# Allegro board mib_rev3ox_v219.brd
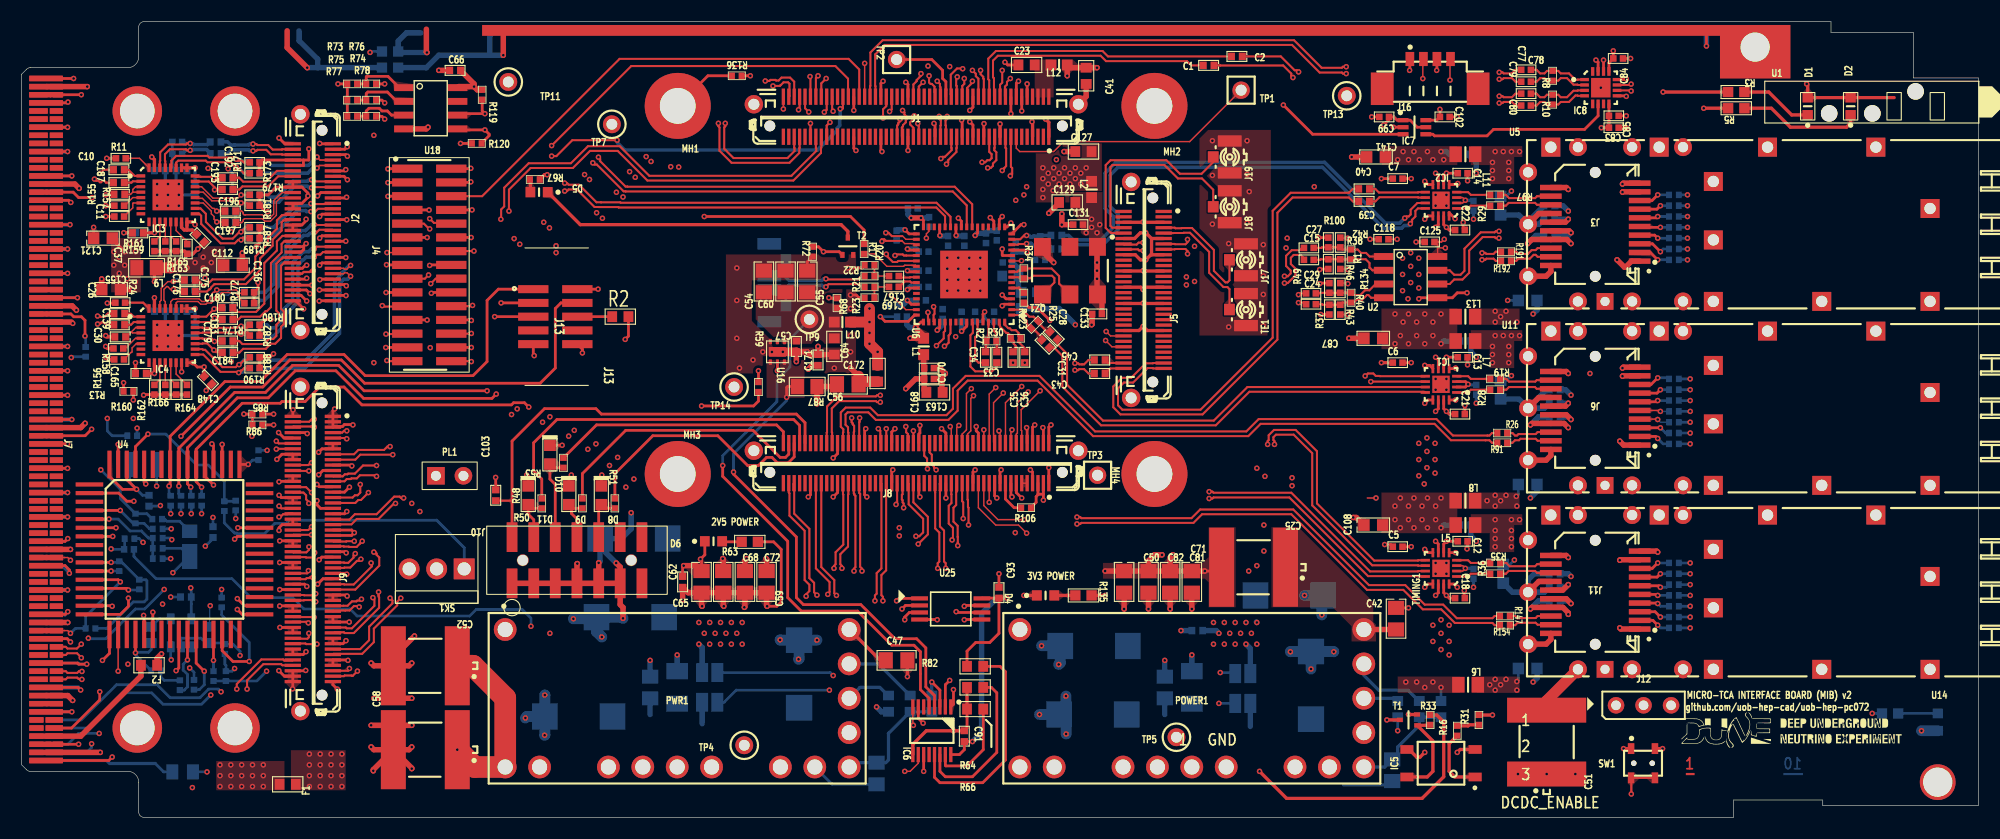
[diagram p0: board, top side]
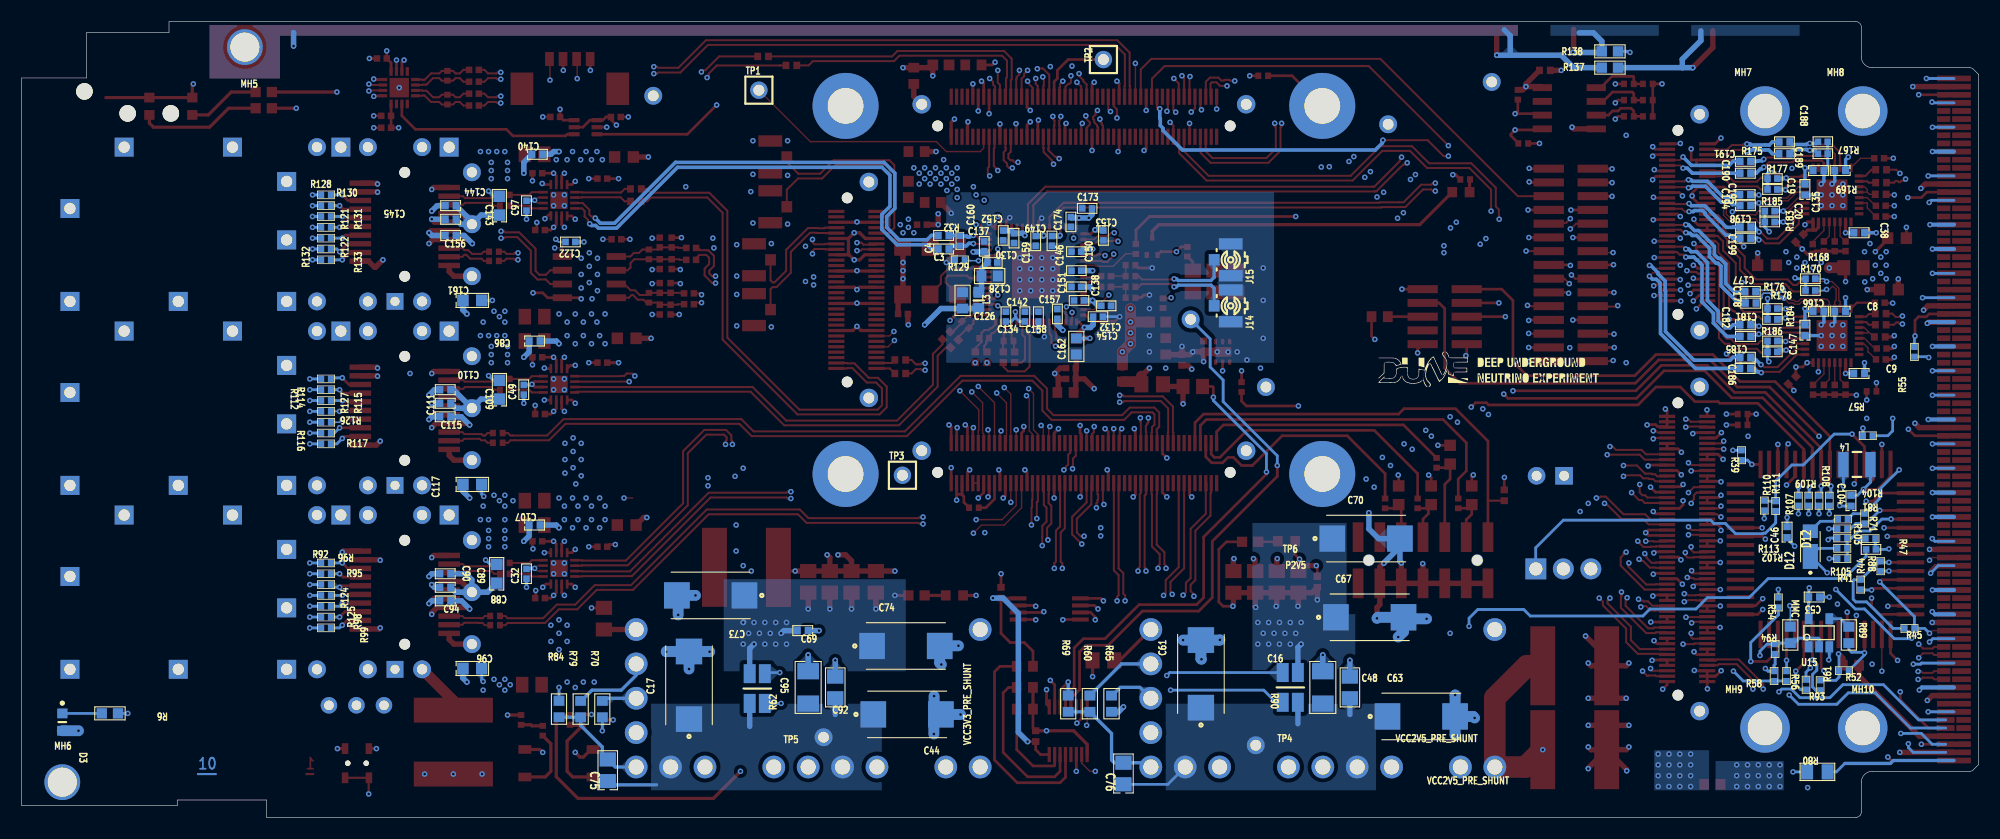
[diagram p1: board, bottom side, seen from below]

Outline 180.6 x 73.5 mm; copper layers: TOP, 02_GND, 03_SIG1, 04_GND, 05_PWR1, 06_GND, 07_SIG2, 08_GND, 09_SIG3, BOTTOM. Coordinates in mm from the lower left corner of the outline.
Outline path: 0,68.65 0.46,69.11 arc(0.62,69.21) 0.8,69.25 0.83,69.25 9.8,69.25 arc(10.51,69.54) 10.8,70.25 10.8,73.01 arc(10.95,73.36) 11.3,73.5 167,73.5 167,72.5 174.6,72.5 174.6,68.3 180.6,68.3 180.6,1.1 166.24,1.1 166.24,1.6 158,1.6 158,0 11.27,0 arc(11.06,0.06) 10.89,0.21 arc(10.82,0.34) 10.8,0.49 10.81,0.49 10.81,3.26 10.8,3.26 arc(10.5,3.96) 9.8,4.25 0.8,4.25 arc(0.62,4.29) 0.46,4.39 0,4.85 0,68.65

## Design rules (mm)
constraint set DEFAULT: min track width 0.127
net group AMC_N_PS: nets AMC_N_PS<0> AMC_N_PS<1>
net group AUXIO_2: nets AUXIO_N2 AUXIO_P2
net group AUXIO_3: nets AUXIO_N3 AUXIO_P3
net group AUXIO_4: nets AUXIO_N4 AUXIO_P4
net group AUXIO_5: nets AUXIO_N5 AUXIO_P5
net group AUXIO_6: nets AUXIO_N6 AUXIO_P6
net group AUXIO_7: nets AUXIO_N7 AUXIO_P7
net group CLK_TST: nets CLK_TST_N CLK_TST_P
net group CLKIN0: nets CLKIN0_N CLKIN0_P
net group CLKIN1: nets CLKIN1_N CLKIN1_P
net group CLKIN2: nets CLKIN2_N CLKIN2_P
net group CLKIN3: nets CLKIN3_N CLKIN3_P
net group DCT_DAT2: nets DCT_DAT2_N DCT_DAT2_P
net group DIRECT_US_DATA_2: nets DIRECT_US_DATA_2_N DIRECT_US_DATA_2_P
net group DP1: nets RCLK_N0 RCLK_N1
net group DP2: nets RCLK_P0 RCLK_P1
net group DP_AUX_GBE_RX: nets AUX_GBE_RX_N AUX_GBE_RX_P
net group DP_AUX_GBE_TX: nets AUX_GBE_TX_N AUX_GBE_TX_P
net group DP_CLK0: nets CLK_N<0> CLK_P<0>
net group DP_CLK1: nets CLK_N<1> CLK_P<1>
net group DP_DATA_IN0: nets DATA_IN_N<0> DATA_IN_P<0>
net group DP_DATA_IN1: nets DATA_IN_N<1> DATA_IN_P<1>
net group DP_DATA_IN2: nets DATA_IN_N<2> DATA_IN_P<2>
net group DP_DATA_IN3: nets DATA_IN_N<3> DATA_IN_P<3>
net group DP_DATA_IN4: nets DATA_IN_N<4> DATA_IN_P<4>
net group DP_DATA_IN5: nets DATA_IN_N<5> DATA_IN_P<5>
net group DP_DATA_IN6: nets DATA_IN_N<6> DATA_IN_P<6>
net group DP_DATA_IN7: nets DATA_IN_N<7> DATA_IN_P<7>
net group DP_DATA_IN8: nets DATA_IN_N<8> DATA_IN_P<8>
net group DP_DATA_IN9: nets DATA_IN_N<9> DATA_IN_P<9>
net group DP_DATA_IN10: nets DATA_IN_N<10> DATA_IN_P<10>
net group DP_DATA_IN11: nets DATA_IN_N<11> DATA_IN_P<11>
net group DP_DATA_OUT0: nets DATA_OUT_N<0> DATA_OUT_P<0>
net group DP_DATA_OUT1: nets DATA_OUT_N<1> DATA_OUT_P<1>
net group DP_DATA_OUT2: nets DATA_OUT_N<2> DATA_OUT_P<2>
net group DP_DATA_OUT3: nets DATA_OUT_N<3> DATA_OUT_P<3>
net group DP_DATA_OUT4: nets DATA_OUT_N<4> DATA_OUT_P<4>
net group DP_DATA_OUT5: nets DATA_OUT_N<5> DATA_OUT_P<5>
net group DP_DATA_OUT6: nets DATA_OUT_N<6> DATA_OUT_P<6>
net group DP_DATA_OUT7: nets DATA_OUT_N<7> DATA_OUT_P<7>
net group DP_DATA_OUT8: nets DATA_OUT_N<8> DATA_OUT_P<8>
net group DP_DATA_OUT9: nets DATA_OUT_N<9> DATA_OUT_P<9>
net group DP_DATA_OUT10: nets DATA_OUT_N<10> DATA_OUT_P<10>
net group DP_DATA_OUT11: nets DATA_OUT_N<11> DATA_OUT_P<11>
net group DP_DC_REF_CLK0: nets DC_REF_CLK_N<0> DC_REF_CLK_P<0>
net group DP_DC_REF_CLK1: nets DC_REF_CLK_N<1> DC_REF_CLK_P<1>
net group DP_DC_REF_CLK2: nets DC_REF_CLK_N<2> DC_REF_CLK_P<2>
net group DP_DC_REF_CLK3: nets DC_REF_CLK_N<3> DC_REF_CLK_P<3>
net group DP_DC_REF_CLK4: nets DC_REF_CLK_N<4> DC_REF_CLK_P<4>
net group DP_DC_REF_CLK5: nets DC_REF_CLK_N<5> DC_REF_CLK_P<5>
net group DP_DC_REF_CLK6: nets DC_REF_CLK_N<6> DC_REF_CLK_P<6>
net group DP_DC_REF_CLK7: nets DC_REF_CLK_N<7> DC_REF_CLK_P<7>
net group DP_DC_REF_CLK8: nets DC_REF_CLK_N<8> DC_REF_CLK_P<8>
net group DP_DC_REF_CLK9: nets DC_REF_CLK_N<9> DC_REF_CLK_P<9>
net group DP_DC_REF_CLK10: nets DC_REF_CLK_N<10> DC_REF_CLK_P<10>
net group DP_DC_REF_CLK11: nets DC_REF_CLK_N<11> DC_REF_CLK_P<11>
net group DP_DFF_REF_CLK0: nets DFF_REF_CLK_N<0> DFF_REF_CLK_P<0>
net group DP_DFF_REF_CLK1: nets DFF_REF_CLK_N<1> DFF_REF_CLK_P<1>
net group DP_DFF_REF_CLK2: nets DFF_REF_CLK_N<2> DFF_REF_CLK_P<2>
net group DP_GBE_RX: nets GBE_RX_N GBE_RX_P
net group DP_GBE_TX: nets GBE_TX_N GBE_TX_P
net group DP_REF_CLK0: nets REF_CLK_N<0> REF_CLK_P<0>
net group DP_REF_CLK1: nets REF_CLK_N<1> REF_CLK_P<1>
net group DP_REF_CLK2: nets REF_CLK_N<2> REF_CLK_P<2>
net group DP_REF_CLK3: nets REF_CLK_N<3> REF_CLK_P<3>
net group DP_REF_CLK4: nets REF_CLK_N<4> REF_CLK_P<4>
net group DP_REF_CLK5: nets REF_CLK_N<5> REF_CLK_P<5>
net group DP_REF_CLK6: nets REF_CLK_N<6> REF_CLK_P<6>
net group DP_REF_CLK7: nets REF_CLK_N<7> REF_CLK_P<7>
net group DP_REF_CLK8: nets REF_CLK_N<8> REF_CLK_P<8>
net group DP_REF_CLK9: nets REF_CLK_N<9> REF_CLK_P<9>
net group DP_REF_CLK10: nets REF_CLK_N<10> REF_CLK_P<10>
net group DP_REF_CLK11: nets REF_CLK_N<11> REF_CLK_P<11>
net group DP_SFP_RD0: nets SFP_RD_N<0> SFP_RD_P<0>
net group DP_SFP_RD1: nets SFP_RD_N<1> SFP_RD_P<1>
net group DP_SFP_RD2: nets SFP_RD_N<2> SFP_RD_P<2>
net group DP_SFP_TD0: nets SFP_TD_N<0> SFP_TD_P<0>
net group DP_SFP_TD1: nets SFP_TD_N<1> SFP_TD_P<1>
net group DP_SFP_TD2: nets SFP_TD_N<2> SFP_TD_P<2>
net group DP_UPSTREAM_DATA0: nets UPSTREAM_DATA_N_<0> UPSTREAM_DATA_P<0>
net group DP_UPSTREAM_DATA1: nets UPSTREAM_DATA_N_<1> UPSTREAM_DATA_P<1>
net group DP_UPSTREAM_DATA2: nets UPSTREAM_DATA_N_<2> UPSTREAM_DATA_P<2>
net group DP_XTAL: nets XA XB
net group DPDATA_FROM_UPSTREAM0: nets DATA_FROM_UPSTREAM_N<0> DATA_FROM_UPSTREAM_P<0>
net group DPDATA_FROM_UPSTREAM1: nets DATA_FROM_UPSTREAM_N<1> DATA_FROM_UPSTREAM_P<1>
net group DPDATA_FROM_UPSTREAM2: nets DATA_FROM_UPSTREAM_N<2> DATA_FROM_UPSTREAM_P<2>
net group DPDFF_CLK2: nets DFF_CLK_N<2> DFF_CLK_P<2>
net group DPSFP_DATA_OUT0: nets SFP_DATA_OUT_N<0> SFP_DATA_OUT_P<0>
net group DPSFP_DATA_OUT1: nets SFP_DATA_OUT_N<1> SFP_DATA_OUT_P<1>
net group DPSFP_DATA_OUT2: nets SFP_DATA_OUT_N<2> SFP_DATA_OUT_P<2>
net group DPUDATA_IN2: nets UDATA_IN_N<2> UDATA_IN_P<2>
net group FBCLK: nets FBCLK_N FBCLK_P
net group MAX9831: nets MAX9831_N MAX9831_P
net group MXCK: nets MXCK_N MXCK_P
net group REFCLK_OUT0: nets REFCLK_OUT0_N REFCLK_OUT0_P
net group REFCLK_OUT1: nets REFCLK_OUT1_N REFCLK_OUT1_P
net group SCOPE: nets SCOPE_N SCOPE_P
net group SFP0_CLKGEN: nets SFP0_CLKGEN_N SFP0_CLKGEN_P
net group SFP1_CLKGEN: nets SFP1_CLKGEN_N SFP1_CLKGEN_P
net group SFP2_CLKGEN: nets SFP2_CLKGEN_N SFP2_CLKGEN_P
net group SFPTD2: nets SFPTD2_N SFPTD2_P
net group AMC_GA: nets AMC_GA<0> AMC_GA<1> AMC_GA<2>
net group BP_1: nets AMC_N_ENABLE IMPB_SCL IMPB_SDA PWR_ON TCK_2 TDI_2 TDO_2 TMS_2
net group CLKGEN_IO_1: nets CLK_INTR CLK_LOL CLK_RST CLK_SCL CLK_SDA CLK_SEL0 CLK_SEL1
net group POWER: nets DCDC_2V5_PG DCDC_3V3_PG DCDC_ENABLE LDO_1V8_PG SENSE_I2C_SCL SENSE_I2C_SDA
net group SFP_LOS: nets SFP_LOS<0> SFP_LOS<1> SFP_LOS<2>
net group SFP_RATE_SELECT: nets SFP_RATE_SELECT<0> SFP_RATE_SELECT<1> SFP_RATE_SELECT<2>
net group SFP_SCL: nets SFP_SCL<0> SFP_SCL<1> SFP_SCL<2>
net group SFP_SDA: nets SFP_SDA<0> SFP_SDA<1> SFP_SDA<2>
net group SFP_TX_DISABLE: nets SFP_TX_DISABLE<0> SFP_TX_DISABLE<1> SFP_TX_DISABLE<2>
net group SFP_TX_FAULT: nets SFP_TX_FAULT<0> SFP_TX_FAULT<1> SFP_TX_FAULT<2>
net group VIN: nets VP12

## Placement (name value [footprint] x y rotation side)
C1  0.1UF  [CAP0402]  109.56 69.46 0 top
C2  0.1UF  [CAP0402]  112.17 70.29 0 top
C3  0.1UF  [CAP0402]  95.51 52.5 180 bottom
C4  0.1UF  [CAP0402]  95.51 53.75 180 bottom
C5  1uF  [C0402]  127.01 25 0 top
C6  1uF  [C0402]  127.01 42 0 top
C7  1uF  [C0402]  127.01 59 0 top
C8  100nF  [CAP0402]  12.76 46.75 180 bottom
C9  1UF  [CAP0402]  11.01 41 180 bottom
C10  0.1UF  [CAP0402]  8.98 59.82 0 top
C11  0.1UF  [CAP0402]  8.98 58.63 0 top
C12  100nF  [C0402]  133.01 25.5 0 top
C13  100nF  [C0402]  133.01 42.5 0 top
C14  100nF  [C0402]  133.01 59.5 0 top
C15  100nF  [C0402]  118.81 51.5 0 top
C16  100UF  [CAP1206]  60.51 12 90 bottom
C17  220uF  [T520V]  119.01 12.2 90 bottom
C18  1nF  [C0402]  132.76 20.25 0 top
C19  100nF  [CAP0402]  14.76 59.75 0 bottom
C20  1UF  [CAP0402]  16.01 58 270 bottom
C21  1nF  [C0402]  132.76 37.25 0 top
C22  1nF  [C0402]  132.76 54.25 0 top
C23  1uF  [C0603]  92.76 69.5 0 top
C24  100nF  [C0402]  119.01 47.4 0 top
C25  220uF  [CTE_VISHAY_597D-M]  113.71 23.1 180 top
C26  0.1UF  [CAP0402]  9.02 46.53 0 top
C27  100nF  [C0402]  118.81 52.6 0 top
C28  0.1UF  [CAP0402]  95.26 44.5 135 top
C29  100nF  [C0402]  119.01 48.4 0 top
C30  0.1UF  [CAP0402]  9.01 45.5 0 top
C31  0.1UF  [CAP0402]  94.51 43.75 135 top
C32  100nF  [C0402]  134.01 22.5 90 bottom
C33  0.1UF  [CAP0402]  90.01 42.5 90 top
C34  0.1UF  [CAP0402]  88.96 42.5 90 top
C35  0.1UF  [CAP0402]  91.51 42.5 90 top
C36  0.1UF  [CAP0402]  92.59 42.5 90 top
C37  100nF  [CAP0402]  10.73 53.99 0 top
C38  1UF  [CAP0402]  11.01 54 180 bottom
C39  0.1UF  [CAP0402]  123.91 56.9 0 top
C40  0.1UF  [CAP0402]  123.91 58.05 0 top
C41  1uF  [C0603]  98.26 68.5 90 top
C42  0.1UF  [CAP0805]  126.86 18.35 90 top
C43  0.1UF  [CAP0402]  99.51 41 180 top
C44  220uF  [T520V]  98.88 9.51 180 bottom
C45  0.1UF  [CAP0402]  99.51 42.25 180 top
C46  0.47UF  [CAP0402]  17.66 26.35 270 bottom
C47  0.1UF  [CAP0805]  80.76 14.5 0 top
C48  0.1UF  [CAP0805]  58.01 12 90 bottom
C49  100nF  [C0402]  134.26 39.5 90 bottom
C50  47UF  [CAP0805]  101.76 21.75 90 top
C51  220uF  [CTE_VISHAY_597D-M]  140.76 6.95 90 top
C52  220uF  [CTE_VISHAY_597D-M]  37.26 14 180 top
C53  0.1UF  [CAP0402]  15.16 20.35 180 bottom
C54  47UF  [CAP0805]  68.51 49.5 90 top
C55  47UF  [CAP0805]  72.51 49.5 90 top
C56  47UF  [CAP0805]  76.26 40 0 top
C57  0.1UF  [CAP0402]  71.51 43.5 270 top
C58  220uF  [CTE_VISHAY_597D-M]  37.26 6.25 180 top
C59  47UF  [CAP0805]  68.76 21.75 90 top
C60  47UF  [CAP0805]  70.51 49.5 90 top
C61  220uF  [T520V]  71.76 13.25 90 bottom
C62  0.1UF  [CAP0402]  61.01 21.75 90 top
C63  220uF  [T520V]  51.42 9.32 180 bottom
C64  0.1UF  [CAP0402]  73.51 42.25 90 top
C65  47UF  [CAP0805]  62.76 21.75 90 top
C66  0.1UF  [CAP0402]  40.01 69 180 top
C67  220uF  [T520V]  56.18 18.48 180 bottom
C68  47UF  [CAP0805]  64.76 21.75 90 top
C69  0.1UF  [CAP0402]  108.51 17.25 180 bottom
C70  220uF  [T520V]  56.51 25.75 180 bottom
C71  47UF  [CAP0805]  108.01 21.75 90 top
C72  47UF  [CAP0805]  66.76 21.75 90 top
C73  220uF  [T520V]  117.01 20.5 0 bottom
C74  220uF  [T520V]  98.99 15.83 180 bottom
C75  0.1UF  [CAP0805]  126.51 4.35 270 bottom
C76  0.1UF  [CAP0805]  78.91 4.05 270 bottom
C77  100nF  [C0402]  138.86 69.05 0 top
C78  100nF  [C0402]  138.86 67.95 0 top
C79  100nF  [C0402]  138.86 66.85 0 top
C80  100nF  [C0402]  138.86 65.75 0 top
C81  47UF  [CAP0805]  106.01 21.75 90 top
C82  47UF  [CAP0805]  104.01 21.75 90 top
C83  1uF  [C0402]  146.96 63.7 180 top
C84  100nF  [C0402]  147.36 70.1 180 top
C85  1nF  [C0402]  146.96 64.8 180 top
C86  0.1UF  [CAP0402]  133.26 44 0 bottom
C87  10UF  [CAP0603]  124.76 44.25 180 top
C88  22UF  [CAP0603]  136.76 22.5 270 bottom
C89  1UF  [CAP0402]  141.51 22.5 180 bottom
C90  0.1UF  [CAP0402]  141.51 21.25 180 bottom
C91  0.1UF  [CAP0402]  87.01 7.5 270 top
C92  0.1UF  [CAP0805]  105.51 12 90 bottom
C93  0.1UF  [CAP0402]  90.21 20.75 90 top
C94  0.1UF  [CAP0402]  141.51 20 180 bottom
C95  100UF  [CAP1206]  108.01 12 90 bottom
C96  22UF  [CAP0603]  139.01 13.75 0 bottom
C97  100nF  [C0402]  134.01 56.5 90 bottom
C99  100nF  [C0402]  125.76 64.7 180 top
C102  100nF  [C0402]  131.36 64.7 0 top
C103  0.1UF  [CAP0402]  43.76 29.75 90 top
C104  0.1UF  [CAP0402]  11.76 29.25 270 bottom
C107  0.1UF  [CAP0402]  133.26 27 0 bottom
C108  10UF  [CAP0603]  124.76 27 180 top
C109  22UF  [CAP0603]  136.51 39.5 270 bottom
C110  1UF  [CAP0402]  141.51 39.5 180 bottom
C111  0.1UF  [CAP0402]  141.51 38.25 180 bottom
C112  10UF  [CAP0603]  19.51 51 0 top
C115  0.1UF  [CAP0402]  141.51 37 180 bottom
C117  22UF  [CAP0603]  139.01 30.75 0 bottom
C118  1uF  [C0402]  125.71 53.4 0 top
C121  10UF  [CAP0603]  7.51 53.5 180 top
C122  100nF  [C0402]  129.96 53.15 0 bottom
C125  1nF  [C0402]  129.96 53.15 0 top
C126  10uF  [C0603]  93.76 47.75 270 bottom
C127  10uF  [C0603]  98.01 61.5 0 top
C128  10uF  [C0603]  91.26 50 0 bottom
C129  10uF  [C0603]  96.51 56.8 0 top
C130  1uF  [C0402]  91.01 51.25 0 bottom
C131  1uF  [C0402]  97.51 54.75 0 top
C132  1uF  [C0402]  80.51 47.25 0 bottom
C133  100nF  [C0402]  99.26 46.5 0 top
C134  1uF  [C0402]  89.76 46.25 270 bottom
C135  100nF  [CAP0402]  12.76 59.75 180 bottom
C136  100nF  [CAP0402]  16.51 53.5 135 top
C137  100nF  [C0402]  91.76 52.75 270 bottom
C138  100nF  [C0402]  83.01 47.75 180 bottom
C139  100nF  [CAP0402]  9.1 44.38 0 top
C140  0.1UF  [CAP0402]  133.01 61.25 0 bottom
C141  10UF  [CAP0603]  125.01 61 180 top
C142  100nF  [C0402]  88.01 46.25 270 bottom
C143  22UF  [CAP0603]  136.51 56.5 270 bottom
C144  1UF  [CAP0402]  141.01 56.5 180 bottom
C145  0.1UF  [CAP0402]  141.01 55.25 180 bottom
C146  100nF  [C0402]  83.26 52.25 180 bottom
C147  1UF  [CAP0402]  16.01 45 270 bottom
C148  100nF  [CAP0402]  17.2 40.38 135 top
C149  100nF  [C0402]  85.51 53.25 90 bottom
C150  100nF  [C0402]  83.26 50.5 180 bottom
C151  100nF  [C0402]  83.26 49 180 bottom
C152  100nF  [C0402]  89.01 53.5 90 bottom
C153  100nF  [C0402]  80.76 53.75 90 bottom
C154  100nF  [C0402]  81.26 46.25 0 bottom
C155  10UF  [CAP0603]  8.26 48.75 180 top
C156  0.1UF  [CAP0402]  141.01 53.75 180 bottom
C157  100nF  [C0402]  85.01 46.5 270 bottom
C158  100nF  [C0402]  86.76 46.25 270 bottom
C159  100nF  [C0402]  87.01 53.25 90 bottom
C160  1uF  [C0402]  90.01 53.75 90 bottom
C161  22UF  [CAP0603]  139.01 47.75 0 bottom
C162  10uF  [C0603]  83.26 43.5 90 bottom
C163  10uF  [C0603]  84.26 39.25 180 top
C165  100nF  [CAP0402]  11.01 41 0 top
C166  100nF  [CAP0402]  14.76 46.75 0 bottom
C167  100nF  [C0402]  80.51 50 180 top
C168  1uF  [C0402]  83.76 40.5 180 top
C169  100nF  [C0402]  80.51 49 180 top
C170  100nF  [C0402]  83.76 41.5 180 top
C171  10uF  [C0603]  75.01 43.5 90 top
C172  10uF  [C0603]  79.01 41 90 top
C173  1uF  [C0402]  82.26 56.25 180 bottom
C174  100nF  [C0402]  83.76 55 90 bottom
C175  100nF  [CAP0402]  15.52 49.63 0 top
C176  100nF  [CAP0402]  15.53 48.57 0 top
C177  100nF  [CAP0402]  21.06 48.58 0 bottom
C178  100nF  [CAP0402]  21.01 47.5 0 bottom
C179  100nF  [CAP0402]  18.99 47.08 0 top
C180  100nF  [CAP0402]  19.01 46 0 top
C181  100nF  [CAP0402]  21.51 45.5 0 bottom
C182  100nF  [CAP0402]  21.5 44.42 0 bottom
C183  100nF  [CAP0402]  19.01 44 0 top
C184  100nF  [CAP0402]  19.02 42.93 0 top
C185  100nF  [CAP0402]  21.51 42.5 0 bottom
C186  100nF  [CAP0402]  21.53 41.47 0 bottom
C187  100nF  [CAP0402]  9.02 57.55 0 top
C188  100nF  [CAP0402]  17.9 62.39 0 bottom
C189  100nF  [CAP0402]  17.91 61.3 0 bottom
C190  100nF  [CAP0402]  21.51 60.6 0 bottom
C191  100nF  [CAP0402]  21.51 59.5 0 bottom
C192  100nF  [CAP0402]  19.01 59.08 0 top
C193  100nF  [CAP0402]  19.01 58 0 top
C194  100nF  [CAP0402]  21.53 57.52 0 bottom
C195  100nF  [CAP0402]  21.51 56.5 0 bottom
C196  100nF  [CAP0402]  19.26 56 0 top
C197  100nF  [CAP0402]  19.28 54.94 0 top
C198  100nF  [CAP0402]  21.49 54.53 0 bottom
C199  100nF  [CAP0402]  21.51 53.5 0 bottom
D1  GREEN  [LEDC1608X80N]  164.85 65.68 90 top
D2  RED  [LEDC1608X80N]  168.81 65.68 90 top
D3  LTST-C170TBKT  [LEDC1608X80N]  176.85 8.8 270 bottom
D4  RED  [LEDC1608X80N]  94.51 20.5 0 top
D5  GREEN  [LEDC1608X80N]  47.76 57.75 180 top
D6  GREEN  [LEDC1608X80N]  63.86 25.5 0 top
D8  PGB1010603NR  [D0603]  53.51 29.75 270 top
D9  PGB1010603NR  [D0603]  50.51 29.75 270 top
D10  PGB1010603NR  [D0603]  48.76 33.5 270 top
D11  PGB1010603NR  [D0603]  46.76 29.75 270 top
D12  -  [SS16FP]  15.51 25 90 bottom
F1  -  [C0603]  24.56 3.05 180 top
F2  -  [C0603]  11.76 14.05 180 top
IC1  -  [QFN50P300X300X90-17N-S160]  131.01 40 180 top
IC2  -  [QFN50P300X300X90-17N-S160]  131.01 57 180 top
IC3  -  [QFN50P500X500X100-33N-S285]  13.51 57.5 0 top
IC4  -  [QFN50P500X500X100-33N-S285]  13.51 44.5 0 top
IC5  -  [TOSHIBA_11-4M1S]  131.01 5 180 top
IC6  -  [SOP50P490X110-16N]  84.01 8 270 top
IC7  -  [SOP65P210X110-6N]  128.56 63.75 0 top
IC8  -  [QFN50P300X300X100-17N-S180]  145.76 67.4 0 top
J1  LSHM-150-03.0-L-DV-A-S-K-TR  [SAMTEC_LSHM-150-04-0-L-DV-A-S]  82.56 64.77 0 top
J2  LSHM-130-03.0-L-DV-A-S-K-TR  [SAMTEC_LSHM-130-04-0-L-DV-A-S]  26.83 54.97 90 top
J3  1367073-1  [TYCO_1367073]  145.24 54.77 180 top
J4  -  [FTSH-115-01-L-DV]  37.62 51.66 270 top
J5  LSHM-130-03.0-L-DV-A-S-K-TR  [SAMTEC_LSHM-130-04-0-L-DV-A-S]  103.51 48.72 90 top
J6  1367073-1  [TYCO_1367073]  145.24 37.78 180 top
J7  MCH_TG1-EDGE-170  [AMC0_R2_BPLUS_PCB_EDGE]  2.25 36.75 0 top
J8  LSHM-150-03.0-L-DV-A-S-K-TR  [SAMTEC_LSHM-150-04-0-L-DV-A-S]  82.56 32.77 0 top
J9  LSHM-150-03.0-L-DV-A-S-K-TR  [SAMTEC_LSHM-150-04-0-L-DV-A-S]  26.83 24.79 90 top
J10  7X2RECPT_SMD_2MM  [HDR14PINSMD]  51.26 23.75 180 top
J11  1367073-1  [TYCO_1367073]  145.24 20.79 180 top
J12  HDR1X3  [HDR_1X3]  147.16 10.35 0 top
J13  -  [SHF-105-01-X-D-SM]  49.26 46.25 270 top
J14  -  [HIROSE_U-FL-R-SMT-1_10]  69.01 47.25 90 bottom
J15  -  [HIROSE_U-FL-R-SMT-1_10]  69.01 51.5 90 bottom
J16  -  [MOLEX_53398-0471]  128.76 68.25 0 top
J17  -  [HIROSE_U-FL-R-SMT-1_10]  113.01 51.5 90 top
J18  -  [HIROSE_U-FL-R-SMT-1_10]  111.51 56.4 90 top
J19  -  [HIROSE_U-FL-R-SMT-1_10]  111.51 61 90 top
L1  120  OHM@100MHZ  [INDC1608X95N]  83.26 43.5 270 top
L2  120  OHM@100MHZ  [INDC1608X95N]  98.76 58 270 top
L3  120  OHM@100MHZ  [INDC1608X95N]  92.26 47.75 90 bottom
L4  10 UH  [INDC2520X220N]  11.21 32.6 0 bottom
L5  1 UH  [INDC2013X105N]  133.26 27 0 top
L6  1 UH  [INDC2013X105N]  133.51 12.25 180 top
L7  1 UH  [INDC2013X105N]  133.26 44 0 top
L8  1 UH  [INDC2013X105N]  133.26 29.25 180 top
L9  -  [C0805]  11.53 50.77 180 top
L10  120  OHM@100MHZ  [INDC1608X95N]  75.76 45.75 0 top
L11  1 UH  [INDC2013X105N]  133.26 61.25 0 top
L12  100R@100MHz  [INDC1608X95N]  95.76 69.5 0 top
L13  1 UH  [INDC2013X105N]  133.26 46.25 180 top
MH1  MT_HOLE  [MOUNTHOLE]  60.56 65.72 0 top
MH2  MT_HOLE  [MOUNTHOLE]  104.56 65.72 0 top
MH3  MT_HOLE  [MOUNTHOLE]  60.56 31.72 0 top
MH4  MT_HOLE  [MOUNTHOLE]  104.56 31.72 0 top
MH5  MT_HOLE  [MOUNTHOLE]  160 71.15 180 bottom
MH6  MT_HOLE  [MOUNTHOLE]  176.85 3.25 180 bottom
MH7  MT_HOLE  [MOUNTHOLE]  19.69 65.25 180 bottom
MH8  MT_HOLE  [MOUNTHOLE]  10.67 65.25 180 bottom
MH9  MT_HOLE  [MOUNTHOLE]  19.69 8.26 180 bottom
MH10  MT_HOLE  [MOUNTHOLE]  10.67 8.26 180 bottom
MMC  00  [C0603]  17.36 16.85 270 bottom
NOREF  -  []  153.21 6.4 0 top
NOREF#2  -  []  153.92 4.25 0 top
NOREF#3  -  []  158 0.73 0 top
NOREF#4  -  []  0 64.12 0 top
NOREF#5  -  []  -27.5 136.85 0 top
NOREF#6  -  []  167 73.04 0 top
NOREF#7  -  []  0.01 0 0 top
NOREF#8  -  []  0 63.55 0 top
NOREF#9  -  []  0 39.45 0 top
NOREF#10  -  []  0.92 4.25 90 top
NOREF#11  -  []  161.05 4 90 top
NOREF#12  -  []  178.32 68.3 90 top
NOREF#13  -  []  -38.3 124.03 0 top
NOREF#14  -  []  142.94 4.81 0 top
NOREF#15  -  []  10.8 72.31 0 top
NOREF#16  -  []  157.38 0 90 top
NOREF#17  -  []  -26.64 123.32 0 top
NOREF#18  -  []  -255.82 -99.62 0 top
NOREF#19  -  []  15.11 0 90 top
NOREF#20  -  []  5.36 4.25 90 top
NOREF#21  -  []  68.05 25.73 180 bottom
PL1  -  [HEADER2X1_STR]  39.51 31.55 0 top
POWER1  -  [PWS_TI_ECP-R-PDSS-T14]  108.01 11 0 top
PWR1  -  [PWS_TI_ECP-R-PDSS-T14]  60.51 11 0 top
QZ1  50MHz  [OSCSC254P500X700X100-6N]  96.76 50.5 270 top
R1  100  [RES0402]  122.71 52 90 top
R2  00  [C0603]  55.26 46.25 0 top
R3  249 OHM  [RES0603]  158.26 67 180 top
R5  249 OHM  [RES0603]  158.26 65.5 180 top
R6  160 OHM  [RES0603]  172.46 9.6 180 bottom
R8  100  [RES0402]  141.31 68.5 270 top
R10  100  [RES0402]  141.31 66.3 270 top
R11  1k  [C0402]  9.16 60.88 0 top
R13  4.99K  [RES0402]  9.86 39.35 0 top
R16  24.9  [RES0402]  132.51 8 90 top
R17  4.99K  [RES0402]  77.76 52.5 270 top
R19  0  [RES0402]  136.01 40.5 180 top
R20  49.9  [RES0402]  78.26 51 180 top
R21  499 OHM  [RES0402]  78.26 50 180 top
R22  499 OHM  [RES0402]  78.26 49 180 top
R23  49.9  [RES0402]  78.26 48 180 top
R24  1k  [C0402]  9.1 47.54 0 top
R25  100  [RES0402]  93.51 45.5 45 top
R26  0  [RES0402]  136.66 35.5 0 top
R27  100  [RES0402]  91.76 44.25 0 top
R28  0  [RES0402]  136.01 39.5 180 top
R29  0  [RES0402]  136.01 56.5 180 top
R30  100  [RES0402]  89.51 44 0 top
R31  24.9  [RES0402]  134.51 9 90 top
R32  100  [RES0402]  94.01 53.25 90 bottom
R33  150K  [RES0402]  130.01 9 270 top
R34  100  [RES0402]  92.51 50.25 270 top
R35  0  [RES0402]  136.01 23.5 180 top
R36  0  [RES0402]  136.01 22.5 180 top
R37  1k  [C0402]  121.71 46.9 90 top
R38  1k  [C0402]  121.71 51.1 90 top
R39  33K  [RES0402]  21.86 33.45 270 bottom
R40  1k  [C0402]  121.71 48.9 270 top
R41  4.7K  [RES0402]  12.56 23.9 180 bottom
R42  1k  [C0402]  121.71 53.1 270 top
R43  2.2k  [C0402]  120.71 46.9 270 top
R44  33K  [RES0402]  9.01 23.2 270 bottom
R45  33K  [RES0402]  6.36 17.45 180 bottom
R46  2.2k  [C0402]  120.61 51.1 270 top
R47  33K  [RES0402]  10.86 21.5 270 bottom
R48  24.9  [RES0402]  50.01 32.75 90 top
R49  2.2k  [C0402]  120.71 48.9 90 top
R50  24.9  [RES0402]  51.76 29 90 top
R51  24.9  [RES0402]  54.76 29 90 top
R52  4.7K  [RES0402]  12.41 13.55 180 bottom
R53  24.9  [RES0402]  48.01 29 90 top
R54  2.2K  [RES0402]  18.46 19.85 270 bottom
R55  49.9  [RES0402]  5.91 43 90 bottom
R56  49.9  [RES0402]  17.71 13.05 270 bottom
R57  33K  [RES0402]  10.21 35.25 180 bottom
R58  2.2K  [RES0402]  18.86 13.05 270 bottom
R59  4.99K  [RES0402]  68.01 39.75 90 top
R60  1.6k  [C0603]  80.01 10.5 90 bottom
R61  33K  [RES0402]  15.91 12.25 270 bottom
R62  0.05  [RES_LVK12]  112.71 11.9 90 bottom
R63  249 OHM  [RES0603]  67.21 25.45 0 top
R64  00  [C0603]  88.01 12 0 top
R65  XX  [C0603]  82.01 10.5 270 bottom
R66  00  [C0603]  88.01 10 0 top
R67  4.99K  [RES0402]  47.37 58.92 180 top
R68  1K  [RES0402]  75.26 47.5 90 top
R69  1  [C0603]  84.01 10.5 90 bottom
R70  1.6k  [C0603]  127.01 10 90 bottom
R71  4.99K  [RES0402]  9.96 25.75 0 bottom
R72  10K  [RES0402]  73.01 52.25 270 top
R73  0  [RES0402]  30.51 67.75 180 top
R74  -  [RES0402]  32.26 67.75 180 top
R75  0  [RES0402]  30.51 66.25 180 top
R76  -  [RES0402]  32.26 66.25 180 top
R77  0  [RES0402]  30.51 64.75 180 top
R78  -  [RES0402]  32.26 64.75 180 top
R79  XX  [C0603]  129.01 10 270 bottom
R80  0  [RES0805]  14.86 4.2 0 bottom
R81  DNF  [RES0402]  10.51 27.6 90 bottom
R82  00  [C0603]  88.01 13.95 0 top
R84  1  [C0603]  131.01 10 90 bottom
R85  10K  [RES0402]  21.76 37.25 180 top
R86  4.99K  [RES0402]  21.76 36.25 0 top
R87  0.27  [C0805]  72.51 39.8 180 top
R88  6.2k  [C0402]  9.91 24.75 0 bottom
R89  00  [C0603]  11.96 16.85 270 bottom
R90  0.05  [RES_LVK12]  63.51 12 270 bottom
R91  0  [RES0402]  136.66 34.6 0 top
R92  4.99K  [RES0402]  152.51 23.5 180 bottom
R93  33K  [RES0402]  14.61 12.2 270 bottom
R94  10K  [RES0402]  18.76 15.55 90 bottom
R95  4.99K  [RES0402]  152.51 22.5 180 bottom
R96  4.99K  [RES0402]  152.51 21.5 180 bottom
R97  0  [RES0402]  136.01 57.5 180 top
R98  4.99K  [RES0402]  152.51 18.5 180 bottom
R99  4.99K  [RES0402]  152.51 17.5 180 bottom
R100  2.2k  [C0402]  120.61 53.1 90 top
R102  33  [RES0402]  12.51 27.55 0 bottom
R103  DNF  [RES0402]  12.56 24.85 0 bottom
R104  390K  [RES0402]  12.56 26.65 0 bottom
R105  330  [RES0402]  12.56 25.8 0 bottom
R106  10K  [RES0402]  92.71 28.6 180 top
R107  1K  [RES0402]  13.76 29.25 90 bottom
R108  1K  [RES0402]  14.71 29.25 90 bottom
R109  1K  [RES0402]  15.66 29.25 90 bottom
R110  30K  [RES0402]  19.76 28.8 90 bottom
R111  150K  [RES0402]  18.71 28.75 270 bottom
R112  4.99K  [RES0402]  152.51 40.5 180 bottom
R113  1K  [RES0402]  16.61 29.25 90 bottom
R114  4.99K  [RES0402]  152.51 39.5 180 bottom
R115  4.99K  [RES0402]  152.51 38.5 180 bottom
R116  4.99K  [RES0402]  152.51 35.5 180 bottom
R117  4.99K  [RES0402]  152.51 34.5 180 bottom
R119  2.2K  [RES0402]  42.51 66.75 270 top
R120  2.2K  [RES0402]  42.01 62.25 0 top
R121  2.2K  [RES0402]  152.51 54.5 180 bottom
R122  2.2K  [RES0402]  152.51 53.5 180 bottom
R123  4.99K  [RES0402]  92.51 48 270 top
R124  2.2K  [RES0402]  152.51 19.5 180 bottom
R125  2.2K  [RES0402]  152.51 20.5 180 bottom
R126  2.2K  [RES0402]  152.51 36.5 180 bottom
R127  2.2K  [RES0402]  152.51 37.5 180 bottom
R128  4.99K  [RES0402]  152.51 57.5 180 bottom
R129  4.99K  [RES0402]  94.01 51.5 180 bottom
R130  4.99K  [RES0402]  152.51 56.5 180 bottom
R131  4.99K  [RES0402]  152.51 55.5 180 bottom
R132  4.99K  [RES0402]  152.51 52.5 180 bottom
R133  4.99K  [RES0402]  152.51 51.5 180 bottom
R134  100  [RES0402]  122.71 48 90 top
R135  249 OHM  [RES0603]  98.01 20.5 0 top
R136  10K  [RES0402]  66.01 68.5 180 top
R137  10M  [RES0603]  34.01 69.25 0 bottom
R138  10M  [RES0603]  34.01 70.75 180 bottom
R147  0  [RES0402]  136.91 18.6 0 top
R154  0  [RES0402]  136.91 17.75 0 top
R155  1k  [C0402]  9.01 56.5 180 top
R156  1k  [C0402]  8.93 43.31 180 top
R157  2.2k  [C0402]  9.01 55.5 0 top
R158  2.2k  [C0402]  9 42.3 0 top
R159  200  [C0402]  12.26 52.75 90 top
R160  200  [C0402]  12.26 39.5 90 top
R161  200  [C0402]  13.26 52.75 90 top
R162  200  [C0402]  13.26 39.5 90 top
R163  200  [C0402]  14.26 52.75 90 top
R164  200  [C0402]  14.26 39.5 90 top
R165  200  [C0402]  15.29 52.5 90 top
R166  200  [C0402]  15.26 39.5 90 top
R167  200  [C0402]  14.36 62.4 0 bottom
R168  200  [C0402]  15.51 49.75 180 bottom
R169  200  [C0402]  14.36 61.3 0 bottom
R170  200  [C0402]  15.51 48.67 180 bottom
R171  200  [C0402]  21.51 60.5 180 top
R172  200  [C0402]  21.01 48.5 180 top
R173  200  [C0402]  21.51 59.5 180 top
R174  200  [C0402]  21.01 47.5 180 top
R175  200  [C0402]  19.01 59 180 bottom
R176  200  [C0402]  19.01 47 180 bottom
R177  200  [C0402]  19.01 58 180 bottom
R178  200  [C0402]  19.01 46 180 bottom
R179  200  [C0402]  21.51 57.5 180 top
R180  200  [C0402]  21.51 45.5 180 top
R181  200  [C0402]  21.51 56.5 180 top
R182  200  [C0402]  21.51 44.5 180 top
R183  200  [C0402]  19.26 56 180 bottom
R184  200  [C0402]  19.01 44 180 bottom
R185  200  [C0402]  19.26 55 180 bottom
R186  200  [C0402]  19.01 43 180 bottom
R187  200  [C0402]  21.51 54.5 180 top
R188  200  [C0402]  21.51 42.5 180 top
R189  200  [C0402]  21.51 53.5 180 top
R190  200  [C0402]  21.51 41.5 180 top
R191  0  [RES0402]  137.01 52.25 0 top
R192  0  [RES0402]  137.01 51.4 0 top
SK1  -  [MOLEX22_23_2031]  38.31 22.95 270 top
SW1  HDT0001  [SW_HDT0001]  149.65 5 180 top
T1  -  [SOTFL50P160X60-3N]  128.01 9 180 top
T2  -  [SOTFL50P160X60-3N]  76.26 52.75 90 top
TE1  -  [HIROSE_U-FL-R-SMT-1_10]  113.01 46.9 90 top
TIMING1  -  [QFN50P300X300X90-17N-S160]  131.01 23 180 top
TP1  -  [TP_HOLE_10]  112.56 67.17 0 top
TP2  -  [TP_HOLE_10]  80.76 70 0 top
TP3  -  [TP_HOLE_10]  99.31 31.6 0 top
TP4  5002 WHITE  [TP_KEYSTONE_5000A]  66.7 6.66 0 top
TP5  5002 WHITE  [TP_KEYSTONE_5000A]  106.59 7.4 0 top
TP7  5002 WHITE  [TP_KEYSTONE_5000A]  54.48 64.02 0 top
TP9  5002 WHITE  [TP_KEYSTONE_5000A]  72.71 46 0 top
TP11  5002 WHITE  [TP_KEYSTONE_5000A]  44.92 67.93 0 top
TP13  5002 WHITE  [TP_KEYSTONE_5000A]  122.31 66.65 0 top
TP14  5002 WHITE  [TP_KEYSTONE_5000A]  65.76 39.75 0 top
U1  5151230F  [LP_515XXX]  170.82 65.02 270 top
U2  -  [SOIC8]  128.21 49.9 0 top
U4  ATMEGA128A-AU  [TQFP64_080]  6.26 30.75 0 top
U5  2227023-1  [SFP_CAGE]  145.24 54.78 180 top
U6  SI5395A-A-GM  [QFN_64]  86.98 50.15 180 top
U11  2227023-1  [SFP_CAGE]  145.24 37.79 180 top
U14  2227023-1  [SFP_CAGE]  145.24 20.8 180 top
U15  SN74LVC1G06  [SOT23-5]  14.71 17.05 90 bottom
U16  TPS74618PQWDRVRQ1  [6-WSON_2X2]  69.76 43 270 top
U18  24AA025E48T-I/SN  [SOIC8]  37.76 65.5 0 top
U25  LM75AIMME/NOPB  [TSSOP8_65P440X300MM]  85.76 19.25 0 top

## Library data of the parts
C1 C2 C39 C40 C43 C45 = CAP_NP_0: Tolerance: TOL?; User Part Number: 445-7348-2-ND; part number: CAP_NP_0-445-7348-2-ND,CAP_NP_0; room: TE0712
C3 C4 C28 C31 C33-C36 = CAP_NP_0: Tolerance: TOL?; User Part Number: 445-7348-2-ND; part number: CAP_NP_0-445-7348-2-ND,CAP_NP_0; room: CLK_GEN_X12
C5-C7 C83 C118 = CAPCERSMDCL2: part number: CAPCERSMDCL2_0402-1UF,16V; tolerance: 10%; room: SFP_DFF_AND_FANOUT
C8 C139 C148 C165 C166 C175-C186 = CAPCERSMDCL2: Tolerance: 10%; User Part Number: CC0402_100NF_16V_10%_X7R; part number: CAPCERSMDCL2_0402-100NF,16V_GEN; tolerance: 10%; room: CLK_FO_6_11
C9 C147 = CAP_NP: Tolerance: TOL?; User Part Number: GRM152R60J105ME15D; part number: CAP_NP-GRM152R60J105ME15D,CAP_NP; room: CLK_FO_6_11
C10 C11 = CAP_NP_0: Tolerance: TOL?; User Part Number: 445-7348-2-ND; part number: CAP_NP_0-445-7348-2-ND,CAP_NP_0; room: CLK_FO_0_5
C12-C15 C24 C27 C29 C32 C49 C77-C80 C84 C97 C99 C102 C122 = CAPCERSMDCL2: part number: CAPCERSMDCL2_0402-100NF,16V_GEN; tolerance: 10%; room: SFP_DFF_AND_FANOUT
C16 C95 = CAP_NP: Tolerance: TOL?; User Part Number: GRM31CD80J107ME39K; part number: CAP_NP-GRM31CD80J107ME39K,CAP_NP; room: MAIN_PWR
C17 C44 C61 C63 C67 C70 C73 C74 = TANTPOLY: part number: TANTPOLY_SMD-220UF,6.3V; tolerance: 20%; room: POWER
C18 C21 C22 C85 C125 = CAPCERSMDCL2: part number: CAPCERSMDCL2_0402-1NF_X7R,50V; tolerance: 10%; room: SFP_DFF_AND_FANOUT
C19 C37 C135 C136 C187-C199 = CAPCERSMDCL2: Tolerance: 10%; User Part Number: CC0402_100NF_16V_10%_X7R; part number: CAPCERSMDCL2_0402-100NF,16V_GEN; tolerance: 10%; room: CLK_FO_0_5
C20 C38 = CAP_NP: Tolerance: TOL?; User Part Number: GRM152R60J105ME15D; part number: CAP_NP-GRM152R60J105ME15D,CAP_NP; room: CLK_FO_0_5
C23 C41 = CAPCERSMDCL2: part number: CAPCERSMDCL2_0603-1UF,16V; tolerance: 10%
C25 C51 C52 C58 = ELCAPTAN: part number: ELCAPTAN_SMD-220UF,25V; tolerance: 20%; room: POWER
C26 C30 = CAP_NP_0: Tolerance: TOL?; User Part Number: 445-7348-2-ND; part number: CAP_NP_0-445-7348-2-ND,CAP_NP_0; room: CLK_FO_6_11
C42 C47 C48 C75 C76 C92 = CAP_NP: Tolerance: TOL?; User Part Number: 445-8173-1-ND; part number: CAP_NP-445-8173-1-ND,CAP_NP; room: MAIN_PWR
C46 = CAP_NP: Tolerance: TOL?; User Part Number: GRM155R60J474KE19J; part number: CAP_NP-GRM155R60J474KE19J,CAP_NP; room: MMC_DISCRETE
C50 C59 = CAP_NP: Tolerance: TOL?; User Part Number: GRM21BR60J476ME15K; part number: CAP_NP-GRM21BR60J476ME15K,CAP_NP; room: VP3V3
C53 C93 C104 = CAP_NP: Tolerance: TOL?; User Part Number: C0402C104K9RACTU; part number: CAP_NP-C0402C104K9RACTU,CAP_NP; room: MMC_DISCRETE
C54-C56 C60 = CAP_NP: Tolerance: TOL?; User Part Number: GRM21BR60J476ME15K; part number: CAP_NP-GRM21BR60J476ME15K,CAP_NP; room: VCC1V8
C57 C64 = CAP_NP: Tolerance: TOL?; User Part Number: 445-7348-2-ND; part number: CAP_NP-445-7348-2-ND,CAP_NP; room: VCC1V8
C62 C69 = CAP_NP: Tolerance: TOL?; User Part Number: 445-7348-2-ND; part number: CAP_NP-445-7348-2-ND,CAP_NP; room: VCC3V3I_V
C65 C68 C71 C72 C81 C82 = CAP_NP: Tolerance: TOL?; User Part Number: GRM21BR60J476ME15K; part number: CAP_NP-GRM21BR60J476ME15K,CAP_NP; room: VCC3V3I_V
C66 = CAP_NP: Tolerance: TOL?; User Part Number: 445-7348-2-ND; part number: CAP_NP-445-7348-2-ND,CAP_NP; room: EEPROM
C86 C90 C94 C107 C111 C115 C140 C145 C156 = CAP_NP: Tolerance: TOL?; User Part Number: 445-7348-2-ND; part number: CAP_NP-445-7348-2-ND,CAP_NP; room: SFP0
C87 C108 C141 = CAP_NP: Tolerance: TOL?; User Part Number: GRM188R61A106KE69D; part number: CAP_NP-GRM188R61A106KE69D,CAP_NP; room: SFP0
C88 C96 C109 C117 C143 C161 = CAP_NP: Tolerance: TOL?; User Part Number: GRM188R60J226MEA0D; part number: CAP_NP-GRM188R60J226MEA0D,CAP_NP; room: SFP0
C89 C110 C144 = CAP_NP: Tolerance: TOL?; User Part Number: GRT155R61E105ME01D; part number: CAP_NP-GRT155R61E105ME01D,CAP_NP; room: SFP0
C91 = CAP_NP_0: Tolerance: TOL?; User Part Number: 445-7348-2-ND; part number: CAP_NP_0-445-7348-2-ND,CAP_NP_0; room: MAIN_PWR
C103 = CAP_NP: Tolerance: TOL?; User Part Number: 445-7348-2-ND; part number: CAP_NP-445-7348-2-ND,CAP_NP; room: JTAG
C112 C121 = CAP_NP: Tolerance: TOL?; User Part Number: GRM188R61A106KE69D; part number: CAP_NP-GRM188R61A106KE69D,CAP_NP; room: CLK_FO_0_5
C126-C129 C162 C163 C171 C172 = CAPCERSMDCL2: part number: CAPCERSMDCL2_0603-10UF,6.3V; tolerance: 20%; room: CLK_GEN_X12
C130-C132 C134 C160 C168 C173 = CAPCERSMDCL2: part number: CAPCERSMDCL2_0402-1UF,16V; tolerance: 10%; room: CLK_GEN_X12
C133 C137 C138 C142 C146 C149-C154 C157-C159 C167 C169 C170 C174 = CAPCERSMDCL2: part number: CAPCERSMDCL2_0402-100NF,16V_GEN; tolerance: 10%; room: CLK_GEN_X12
C155 = CAP_NP: Tolerance: TOL?; User Part Number: GRM188R61A106KE69D; part number: CAP_NP-GRM188R61A106KE69D,CAP_NP; room: CLK_FO_6_11
D1 D5 = LED GREEN 0603_0: part number: LED GREEN 0603_0-LNJ326W83RA,LED GREEN 0603_0; room: MMC
D2 = LED RED 0603_0: part number: LED RED 0603_0-LNJ237W82RA,LED RED 0603_0; room: MMC
D3 = LED_0: part number: LED_0-LTST-C193TBKT-5A,LED_0; room: MMC
D4 = LED RED 0603_0: part number: LED RED 0603_0-LNJ237W82RA,LED RED 0603_0; room: VCC3V3I_V
D6 = LED GREEN 0603_0: part number: LED GREEN 0603_0-LNJ326W83RA,LED GREEN 0603_0; room: POWER
D8-D11 = TVS_2X: Tolerance: TOL?; part number: TVS_2X-PGB1010603NR,TVS_2X; room: JTAG
D12 = SS16FP
F1 = SF-0603S300-2
F2 = SF-0603FP015F-2
IC1 IC2 TIMING1 = SY58608U: part number: SY58608UMG; room: SFP_DFF_AND_FANOUT
IC3 = ADCLK948: part number: ADCLK948BCPZ; room: CLK_FO_0_5
IC4 = ADCLK948: part number: ADCLK948BCPZ; room: CLK_FO_6_11
IC5 = OPTOCOUPLER_AC_EC: part number: TOSHIBA; room: POWER
IC6 = LTC2991: part number: LTC2991CMS#PBF; room: POWER
IC7 = 74AVC1T45: part number: SN74AVC1T45DCK
IC8 = 854S01I: part number: 854S01AKILF
J1 = TE0712 CONNECTOR-JB1: part number: TE0712 CONNECTOR-JB1-LSHM-150-03.0-L-DV-A-S-K-TR,TE0712 CONNECTOR-JB1
J2 = LSHM-130-0XXX-L-DV-A-S: part number: LSHM-130-0XXX-L-DV-A-S-LSHM-130-03.0-L-DV-A-S-K-TR,LSHM-130-0XXX-L-DV-A-S
J3 J6 J11 = CON20P_SFP-1367073-1: part number: CON20P_SFP-1367073-1-1367073-1,CON20P_SFP-1367073-1; room: SFP0
J4 = CONN30P: part number: CONN30P-FTSH-115-01-L-DV,CONN30P
J5 = TE0712 CONNECTOR-JB3: part number: TE0712 CONNECTOR-JB3-LSHM-130-03.0-L-DV-A-S-K-TR,TE0712 CONNECTOR-JB3
J7 = MCH_CONNECTOR1: part number: MCH_CONNECTOR1-MCH1B-EDGE-170,MCH_CONNECTOR1
J8 = TE0712 CONNECTOR-JB2: part number: TE0712 CONNECTOR-JB2-LSHM-150-03.0-L-DV-A-S-K-TR,TE0712 CONNECTOR-JB2
J9 = LSHM-150-0XXX-L-DV-A-S: part number: LSHM-150-0XXX-L-DV-A-S-LSHM-150-03.0-L-DV-A-S-K-TR,LSHM-150-0XXX-L-DV-A-S
J10 = 7X2RECPT_SMD_2MM: User Part Number: 878321420; part number: 7X2RECPT_SMD_2MM-878321420,7X2RECPT_SMD_2MM; room: JTAG
J12 = HDR1X3: part number: HDR1X3-HDR1X3,HDR1X3; room: USB-JTAG
J13 = SHF-105-01-L-D-SM
J14 J15 = PCOAX: part number: PCOAX-U.FL-R-SMT-1(10); room: CLK_GEN_X12
J16 = CON4P: part number: CON4P-53398-0471
J17-J19 TE1 = PCOAX: part number: PCOAX-U.FL-R-SMT-1(10)
L1-L3 L10 = IND: part number: IND-BLM18AG121SN1D,IND; room: CLK_GEN_X12
L4 = IND: part number: IND-74438323100,IND; room: MMC_DISCRETE
L5 L6 = IND: part number: IND-CIGT201208EH1R0MNE,IND; room: SFP1
L7 L8 = IND: part number: IND-CIGT201208EH1R0MNE,IND; room: SFP2
L9 = FERRITE: part number: FERRITE_SMD-BLM21PG221SN1,MURATA; room: CLK_FO_0_5
L11 L13 = IND: part number: IND-CIGT201208EH1R0MNE,IND; room: SFP3
L12 = FERRITE: part number: FERRITE_SMD-MPZ1608S101A,TDK
MH1-MH4 = MT_HOLE: part number: MT_HOLE-MT_HOLE,MT_HOLE; room: TE0712
MH5-MH10 = MT_HOLE: part number: MT_HOLE-MT_HOLE,MT_HOLE
MMC R2 R89 = RSMD0603: part number: RSMD0603_-00,
PL1 = HEADER2X1: User Part Number: Harwin M20-999 02 05; Tolerance: XXX; part number: HEADER2X1_STR-HARWIN
POWER1 PWR1 = PTH08T210W: part number: PTH08T210WAD; room: POWER
QZ1 = OSC_6P_ENDIS_OUTP_OUTN: part number: SIT5021AI-2DE-25E-50.000000; room: CLK_GEN_X12
R1 R8 R10 R134 = R: Tolerance: TOL?; User Part Number: ERJ-2RKF1000X; part number: R-ERJ-2RKF1000X,R; room: SFP_DFF_AND_FANOUT
R3 R5 = R: Tolerance: TOL?; User Part Number: EMA-00003608; part number: R-EMA-00003608,R; room: MMC
R6 = R: Tolerance: TOL?; User Part Number: ERJ-3EKF1600V; part number: R-ERJ-3EKF1600V,R; room: MMC
R11 R155 = RSMD0402: part number: RSMD0402_1/16W-1K,1%; tolerance: 1%; room: CLK_FO_0_5
R13 = R: Tolerance: TOL?; User Part Number: ERJ-2RKF4991X; part number: R-ERJ-2RKF4991X,R; room: TE0712
R16 R31 R48 R50 R51 R53 = R: Tolerance: TOL?; User Part Number: 311-24.9LRCT-ND; part number: R-311-24.9LRCT-ND,R; room: JTAG
R17 R123 R129 = R: Tolerance: TOL?; User Part Number: ERJ-2RKF4991X; part number: R-ERJ-2RKF4991X,R; room: CLK_GEN_X12
R19 R26 R28 R29 R35 R36 R91 R97 R147 R154 R191 R192 = R: Tolerance: TOL?; User Part Number: EMA-00007500V42; part number: R-EMA-00007500V42,R; room: SFP_DFF_AND_FANOUT
R20 R23 = R: Tolerance: TOL?; User Part Number: 311-49.9LRCT-ND; part number: R-311-49.9LRCT-ND,R; room: CLK_GEN_X12
R21 R22 = R: Tolerance: TOL?; User Part Number: ERJ-2RKF4990X; part number: R-ERJ-2RKF4990X,R; room: CLK_GEN_X12
R24 R156 = RSMD0402: part number: RSMD0402_1/16W-1K,1%; tolerance: 1%; room: CLK_FO_6_11
R25 R27 R30 R32 R34 = R: Tolerance: TOL?; User Part Number: ERJ-2RKF1000X; part number: R-ERJ-2RKF1000X,R; room: CLK_GEN_X12
R33 R111 = R: Tolerance: TOL?; User Part Number: ERJ-2RKF1503X; part number: R-ERJ-2RKF1503X,R; room: MMC_DISCRETE
R37 R38 R40 R42 = RSMD0402: part number: RSMD0402_1/16W-1K,1%; tolerance: 1%; room: SFP_DFF_AND_FANOUT
R39 R44 R45 R47 R57 R61 R93 = R: Tolerance: TOL?; User Part Number: ERJ-2RKF3302X; part number: R-ERJ-2RKF3302X,R; room: MMC_DISCRETE
R41 R52 = R: Tolerance: TOL?; User Part Number: ERJ-2RKF4701X; part number: R-ERJ-2RKF4701X,R; room: MMC_DISCRETE
R43 R46 R49 R100 = RSMD0402: part number: RSMD0402_1/16W-2.2K,1%; tolerance: 1%; room: SFP_DFF_AND_FANOUT
R54 R58 = R: Tolerance: TOL?; User Part Number: ERJ-2RKF2201X; part number: R-ERJ-2RKF2201X,R; room: MMC
R55 R56 = R: Tolerance: TOL?; User Part Number: ERJ-2RKF49R9X; part number: R-ERJ-2RKF49R9X,R; room: MMC_DISCRETE
R59 R67 = R: Tolerance: TOL?; User Part Number: ERJ-2RKF4991X; part number: R-ERJ-2RKF4991X,R; room: VCC1V8
R60 R70 = RSMD0603: part number: RSMD0603_1/10W-1.6K,1%; tolerance: 1%; room: POWER
R62 R90 = RES_SR: part number: RES_SR_LVK12-0.05,1%; room: POWER
R63 = R: Tolerance: TOL?; User Part Number: EMA-00003608; part number: R-EMA-00003608,R; room: POWER
R64 R66 R82 = RSMD0603: part number: RSMD0603_-00,; room: POWER
R65 R79 = RSMD0603: part number: RSMD0603_1/10W-XX,1%; tolerance: 1%; room: POWER
R68 = R: Tolerance: TOL?; User Part Number: ERJ-2RKF1001X; part number: R-ERJ-2RKF1001X,R; room: VCC1V8
R69 R84 = RSMD0603: part number: RSMD0603_1/10W-1,1%; tolerance: 1%; room: POWER
R71 R86 = R: Tolerance: TOL?; User Part Number: ERJ-2RKF4991X; part number: R-ERJ-2RKF4991X,R; room: VP3V3
R72 = R: Tolerance: TOL?; User Part Number: M55342K11B10E0RS3; part number: R-M55342K11B10E0RS3,R; room: VCC1V8
R73 R75 R77 = R: Tolerance: TOL?; User Part Number: EMA-00007500V42; part number: R-EMA-00007500V42,R; room: EEPROM
R74 R76 R78 = R: Tolerance: TOL?; User Part Number: NO_STUFF; part number: R-NO_STUFF,R; room: EEPROM
R80 = R: Tolerance: TOL?; User Part Number: ERJ-6GEY0R00V; part number: R-ERJ-6GEY0R00V,R
R81 R103 = R: Tolerance: TOL?; part number: R-DNF,R
R85 = R: Tolerance: TOL?; User Part Number: M55342K11B10E0RS3; part number: R-M55342K11B10E0RS3,R; room: MAIN_PWR
R87 = RSMD0805: part number: RSMD0805_125MW-0.27,1%; tolerance: 1%; room: POWER
R88 = RSMD0402: part number: RSMD0402_1/16W-6.2K,1%; tolerance: 1%; room: POWER
R92 R95 R96 R98 R99 R112 R114-R117 R128 R130-R133 = R: Tolerance: TOL?; User Part Number: ERJ-2RKF4991X; part number: R-ERJ-2RKF4991X,R; room: SFP0
R94 R106 R136 = R: Tolerance: TOL?; User Part Number: M55342K11B10E0RS3; part number: R-M55342K11B10E0RS3,R
R102 = R: Tolerance: TOL?; User Part Number: ERJ-2RKF33R0X; part number: R-ERJ-2RKF33R0X,R; room: MMC_DISCRETE
R104 = R: Tolerance: TOL?; User Part Number: ERJ-2RKF3903X; part number: R-ERJ-2RKF3903X,R; room: MMC_DISCRETE
R105 = R: Tolerance: TOL?; User Part Number: ERJ-PA2F3300X; part number: R-ERJ-PA2F3300X,R; room: MMC_DISCRETE
R107-R109 R113 = R: Tolerance: TOL?; User Part Number: ERJ-2RKF1001X; part number: R-ERJ-2RKF1001X,R; room: MMC_DISCRETE
R110 = R: Tolerance: TOL?; User Part Number: ERA-2AEB303X; part number: R-ERA-2AEB303X,R; room: MMC_DISCRETE
R119-R122 R124-R127 = R: Tolerance: TOL?; User Part Number: ERJ-2RKF2201X; part number: R-ERJ-2RKF2201X,R; room: SFP I2C SWITCH
R135 = R: Tolerance: TOL?; User Part Number: EMA-00003608; part number: R-EMA-00003608,R; room: VCC3V3I_V
R137 R138 = R: Tolerance: TOL?; User Part Number: CRCW060310M0FKEAC; part number: R-CRCW060310M0FKEAC,R
R157 = RSMD0402: part number: RSMD0402_1/16W-2.2K,1%; tolerance: 1%; room: CLK_FO_0_5
R158 = RSMD0402: part number: RSMD0402_1/16W-2.2K,1%; tolerance: 1%; room: CLK_FO_6_11
R159 R161 R163 R165 R167 R169 R171 R173 R175 R177 R179 R181 R183 R185 R187 R189 = RSMD0402: part number: RSMD0402_1/16W-200,1%; tolerance: 1%; room: CLK_FO_0_5
R160 R162 R164 R166 R168 R170 R172 R174 R176 R178 R180 R182 R184 R186 R188 R190 = RSMD0402: part number: RSMD0402_1/16W-200,1%; tolerance: 1%; room: CLK_FO_6_11
SK1 = KKCON3: part number: KKCON3_STR-MOLEX; room: POWER
SW1 = HDT0001: part number: HDT0001-HDT0001,HDT0001; room: MMC
T1 T2 = TRANS MOSFET: part number: TRANS MOSFET_GSD-PJE8408,SOT523; room: POWER
TP1-TP3 = TP: part number: TP_HOLE-1.0MM
TP4 TP5 = TESTPOINT: part number: TESTPOINT-EMA-00001481V22,TESTPOINT; room: MAIN_PWR
TP7 = TESTPOINT: part number: TESTPOINT-EMA-00001481V22,TESTPOINT; room: POWER
TP9 TP14 = TESTPOINT: part number: TESTPOINT-EMA-00001481V22,TESTPOINT; room: VCC1V8
TP11 TP13 = TESTPOINT: part number: TESTPOINT-EMA-00001481V22,TESTPOINT; room: VCC3V3I_V
U1 = LP_515XXX: part number: LP_515XXX-5151230F,LP_515XXX
U2 = MAX9381ESA: part number: MAX9381ESA_SMD-MAX9381ESA
U4 = ATMGA128: part number: ATMGA128-ATMEGA128A-AU,ATMGA128
U5 U11 U14 = SFP_CAGE-2227023-1: part number: SFP_CAGE-2227023-1-2227023-1,SFP_CAGE-2227023-1; room: SFP0
U6 = SI5395A-A-GM: part number: SI5395A-A-GM-SI5395A-A-GM,SI5395A-A-GM; room: CLK_GEN_X12
U15 = INV_1CH_OD: part number: INV_1CH_OD-SN74LVC1G06DBVTE4,INV_1CH_OD; room: MMC_DISCRETE
U16 = TPS74618P: part number: TPS74618P-TPS74618PQWDRVRQ1,TPS74618P; room: VCC1V8
U18 = 24AA025E48T-I/SN: part number: 24AA025E48T-I/SN-24AA025E48T-I/SN,24AA025E48T-I/SN; room: EEPROM
U25 = LM75A: part number: LM75A-LM75AIMME/NOPB,LM75A

## Footprints (pads in the part's own frame, mm; a bottom-side part is the same pattern mirrored in y, then rotated)
6-WSON_2X2
  rrect 0.5x0.3 smd: 1(-0.95,0.65) 2(-0.95,0) 3(-0.95,-0.65) 4(0.95,-0.65) 5(0.95,0) 6(0.95,0.65)
  rrect 0.9x1.6 smd: 7(0,0)
AMC0_R2_BPLUS_PCB_EDGE
  rect 1.3x0.5 smd: (-0.888,21) (-0.888,9.75) (-0.888,-1.5) (-0.888,-12.75) (-0.888,-19.5) (-0.888,-26.25) (-0.888,-27.75) (-0.888,-27.75) (-0.888,-28.5) (-0.888,-28.5) (-0.888,-29.25) (-0.888,-30) (-0.888,-30.75)
  rect 1.7x0.5 smd: (-0.7,30.75) (-0.7,30) (-0.7,28.5) (-0.7,28.5) (-0.7,27.75) (-0.7,27.75) (-0.7,26.25) (-0.7,26.25) (-0.7,25.5) (-0.7,25.5) (-0.7,24) (-0.7,24) (-0.7,23.25) (-0.7,23.25) (-0.7,21.75) (-0.7,21) (-0.7,19.5) (-0.7,19.5) (-0.7,18.75) (-0.7,18.75) (-0.7,17.25) (-0.7,17.25) (-0.7,16.5) (-0.7,16.5) (-0.7,15) (-0.7,15) (-0.7,14.25) (-0.7,14.25) (-0.7,12.75) (-0.7,12.75) (-0.7,12) (-0.7,10.5) (-0.7,9.75) (-0.7,8.25) (-0.7,8.25) (-0.7,7.5) (-0.7,7.5) (-0.7,6) (-0.7,6) (-0.7,5.25) (-0.7,5.25) (-0.7,3.75) (-0.7,3.75) (-0.7,3) (-0.7,3) (-0.7,1.5) (-0.7,1.5) (-0.7,0.75) (-0.7,0.75) (-0.7,-0.75) (-0.7,-1.5) (-0.7,-3) (-0.7,-3) (-0.7,-3.75) (-0.7,-3.75) (-0.7,-5.25) (-0.7,-5.25) (-0.7,-6) (-0.7,-6) (-0.7,-7.5) (-0.7,-7.5) (-0.7,-8.25) (-0.7,-8.25) (-0.7,-9.75) (-0.7,-9.75) (-0.7,-10.5) (-0.7,-10.5) (-0.7,-12) (-0.7,-12.75) (-0.7,-14.25) (-0.7,-14.25) (-0.7,-15) (-0.7,-15) (-0.7,-16.5) (-0.7,-16.5) (-0.7,-17.25) (-0.7,-17.25) (-0.7,-18.75) (-0.7,-19.5) (-0.7,-21) (-0.7,-21) (-0.7,-21.75) (-0.7,-21.75) (-0.7,-23.25) (-0.7,-23.25) (-0.7,-24) (-0.7,-24) (-0.7,-25.5) (-0.7,-26.25)
  rect 2x0.5 smd: (-0.55,30) (-0.55,-30)
  rect 3.1x0.5 smd: 1(0,-31.5) 2(0,-30.75) 4(0,-29.25) 7(0,-27) 9(0,-25.5) 10(0,-24.75) 13(0,-22.5) 16(0,-20.25) 18(0,-18.75) 19(0,-18) 22(0,-15.75) 25(0,-13.5) 27(0,-12) 28(0,-11.25) 31(0,-9) 34(0,-6.75) 37(0,-4.5) 40(0,-2.25) 42(0,-0.75) 43(0,0) 46(0,2.25) 49(0,4.5) 52(0,6.75) 55(0,9) 57(0,10.5) 58(0,11.25) 61(0,13.5) 64(0,15.75) 67(0,18) 70(0,20.25) 72(0,21.75) 73(0,22.5) 76(0,24.75) 79(0,27) 82(0,29.25) 84(0,30.75) 85(0,31.5) 86(0,31.5) 89(0,29.25) 92(0,27) 95(0,24.75) 98(0,22.5) 101(0,20.25) 104(0,18) 107(0,15.75) 110(0,13.5) 112(0,12) 113(0,11.25) 116(0,9) 119(0,6.75) 122(0,4.5) 125(0,2.25) 128(0,0) 131(0,-2.25) 134(0,-4.5) 137(0,-6.75) 140(0,-9) 143(0,-11.25) 146(0,-13.5) 149(0,-15.75) 152(0,-18) 155(0,-20.25) 158(0,-22.5) 161(0,-24.75) 164(0,-27) 170(0,-31.5)
  rect 0.9x0.5 smd: 3(1.1,-30) 83(1.1,30)
  rect 1.6x0.5 smd: 5(0.762,-28.5) 6(0.762,-27.75) 8(0.762,-26.25) 17(0.762,-19.5) 26(0.762,-12.75) 41(0.762,-1.5) 56(0.762,9.75) 71(0.762,21) 165(0.762,-27.75) 166(0.762,-28.5) 167(0.762,-29.25) 168(0.762,-30) 169(0.762,-30.75)
  rect 1.2x0.5 smd: 11(0.95,-24) 12(0.95,-23.25) 14(0.95,-21.75) 15(0.95,-21) 20(0.95,-17.25) 21(0.95,-16.5) 23(0.95,-15) 24(0.95,-14.25) 29(0.95,-10.5) 30(0.95,-9.75) 32(0.95,-8.25) 33(0.95,-7.5) 35(0.95,-6) 36(0.95,-5.25) 38(0.95,-3.75) 39(0.95,-3) 44(0.95,0.75) 45(0.95,1.5) 47(0.95,3) 48(0.95,3.75) 50(0.95,5.25) 51(0.95,6) 53(0.95,7.5) 54(0.95,8.25) 59(0.95,12) 60(0.95,12.75) 62(0.95,14.25) 63(0.95,15) 65(0.95,16.5) 66(0.95,17.25) 68(0.95,18.75) 69(0.95,19.5) 74(0.95,23.25) 75(0.95,24) 77(0.95,25.5) 78(0.95,26.25) 80(0.95,27.75) 81(0.95,28.5) 87(0.95,30.75) 88(0.95,30) 90(0.95,28.5) 91(0.95,27.75) 93(0.95,26.25) 94(0.95,25.5) 96(0.95,24) 97(0.95,23.25) 99(0.95,21.75) 100(0.95,21) 102(0.95,19.5) 103(0.95,18.75) 105(0.95,17.25) 106(0.95,16.5) 108(0.95,15) 109(0.95,14.25) 111(0.95,12.75) 114(0.95,10.5) 115(0.95,9.75) 117(0.95,8.25) 118(0.95,7.5) 120(0.95,6) 121(0.95,5.25) 123(0.95,3.75) 124(0.95,3) 126(0.95,1.5) 127(0.95,0.75) 129(0.95,-0.75) 130(0.95,-1.5) 132(0.95,-3) 133(0.95,-3.75) 135(0.95,-5.25) 136(0.95,-6) 138(0.95,-7.5) 139(0.95,-8.25) 141(0.95,-9.75) 142(0.95,-10.5) 144(0.95,-12) 145(0.95,-12.75) 147(0.95,-14.25) 148(0.95,-15) 150(0.95,-16.5) 151(0.95,-17.25) 153(0.95,-18.75) 154(0.95,-19.5) 156(0.95,-21) 157(0.95,-21.75) 159(0.95,-23.25) 160(0.95,-24) 162(0.95,-25.5) 163(0.95,-26.25)
C0402
  rect 0.6x0.6 smd: 1(-0.45,0) 2(0.45,0)
C0603
  rect 0.9x1 smd: 1(-0.75,0) 2(0.75,0)
C0805
  rect 1.2x1.4 smd: 1(-0.9,0) 2(0.9,0)
CAP0402
  rect 0.635x0.686 smd: 1(-0.499,0) 2(0.499,0)
CAP0603
  rect 1.05x1.08 smd: 1(-0.865,0) 2(0.865,0)
CAP0805
  rect 1.3x1.5 smd: 1(-1,0) 2(1,0)
CAP1206
  rect 1.5x2 smd: 1(-1.5,0) 2(1.5,0)
CTE_VISHAY_597D-M
  rect 2.3x7.3 smd: 1(-2.95,0) 2(2.95,0)
D0603
  rect 1.05x1.08 smd: 1(-0.865,0) 2(0.865,0)
FTSH-115-01-L-DV
  rect 0.75x2.8 smd: 1(-8.255,-2.03) 2(-8.255,2.03) 3(-6.985,-2.03) 4(-6.985,2.03) 5(-5.715,-2.03) 6(-5.715,2.03) 7(-4.445,-2.03) 8(-4.445,2.03) 9(-3.175,-2.03) 10(-3.175,2.03) 11(-1.905,-2.03) 12(-1.905,2.03) 13(-0.635,-2.03) 14(-0.635,2.03) 15(0.635,-2.03) 16(0.635,2.03) 17(1.905,-2.03) 18(1.905,2.03) 19(3.175,-2.03) 20(3.175,2.03) 21(4.445,-2.03) 22(4.445,2.03) 23(5.715,-2.03) 24(5.715,2.03) 25(6.985,-2.03) 26(6.985,2.03) 27(8.255,-2.03) 28(8.255,2.03) 29(9.525,-2.032) 30(9.525,2.032)
HDR14PINSMD
  round 1.092 hole 0.991 unplated: (-5.004,0) (5.004,0)
  rect 0.991x2.743 smd: 1(5.994,2.134) 2(5.994,-2.134) 3(3.988,2.134) 4(3.988,-2.134) 5(2.007,2.134) 6(2.007,-2.134) 7(0,2.134) 8(0,-2.134) 9(-2.007,2.134) 10(-2.007,-2.134) 11(-3.988,2.134) 12(-3.988,-2.134) 13(-5.994,2.134) 14(-5.994,-2.134)
HDR_1X3
  round 1.524 hole 0.889: 1(0,0) 2(2.54,0) 3(5.08,0)
HEADER2X1_STR
  rect 1.626x1.626 hole 0.914: 1(-1.27,0)
  round 1.626 hole 0.914: 2(1.27,0)
HIROSE_U-FL-R-SMT-1_10
  rect 1.05x1 smd: 1(0,1.525)
  rect 1.05x2.2 smd: 2(-1.475,0) 3(1.475,0)
INDC1608X95N
  rect 1x1 smd: 1(-0.75,0) 2(0.75,0)
INDC2013X105N
  rect 1.15x1.45 smd: 1(-0.9,0) 2(0.9,0)
INDC2520X220N
  rect 0.95x2.3 smd: 1(-1.25,0) 2(1.25,0)
LEDC1608X80N
  rect 0.9x0.95 smd: 1(-0.8,0) 2(0.8,0)
LP_515XXX
  round 1.524 hole 1.524 unplated: (-2.032,3.988) (0,0) (0,-3.988)
MOLEX22_23_2031
  rect 1.93x1.93 hole 1.219: 1(0,2.54)
  round 1.93 hole 1.219: 2(0,0) 3(0,-2.54)
MOLEX_53398-0471
  rect 2.1x3 smd: (-3.175,-0.95) (5.675,-0.95)
  rect 0.8x1.3 smd: 1(-0.625,1.8) 2(0.625,1.8) 3(1.875,1.8) 4(3.125,1.8)
MOUNTHOLE
  round 6.096 hole 3.302: 1(0,0)
OSCSC254P500X700X100-6N
  rect 1.65x1.55 smd: 1(-2.2,2.54) 2(-2.2,0) 3(-2.2,-2.54) 4(2.2,-2.54) 5(2.2,0) 6(2.2,2.54)
PWS_TI_ECP-R-PDSS-T14
  round 2.1 hole 1.4: 1(-15.875,6.35) 2(-15.875,-6.35) 3(-12.7,-6.35) 4(-6.35,-6.35) 5(-3.175,-6.35) 6(0,-6.35) 7(3.175,-6.35) 8(9.525,-6.35) 9(12.7,-6.35) 10(15.875,-6.35) 11(15.875,-3.175) 12(15.875,0) 13(15.875,3.175) 14(15.875,6.35)
QFN50P300X300X90-17N-S160
  rect 0.85x0.25 smd: 1(-1.45,0.75) 2(-1.45,0.25) 3(-1.45,-0.25) 4(-1.45,-0.75) 9(1.45,-0.75) 10(1.45,-0.25) 11(1.45,0.25) 12(1.45,0.75)
  rect 0.25x0.85 smd: 5(-0.75,-1.45) 6(-0.25,-1.45) 7(0.25,-1.45) 8(0.75,-1.45) 13(0.75,1.45) 14(0.25,1.45) 15(-0.25,1.45) 16(-0.75,1.45)
  rect 1.6x1.6 smd: 17(0,0)
QFN50P300X300X100-17N-S180
  rect 0.8x0.3 smd: 1(-1.5,0.75) 2(-1.5,0.25) 3(-1.5,-0.25) 4(-1.5,-0.75) 9(1.5,-0.75) 10(1.5,-0.25) 11(1.5,0.25) 12(1.5,0.75)
  rect 0.3x0.8 smd: 5(-0.75,-1.5) 6(-0.25,-1.5) 7(0.25,-1.5) 8(0.75,-1.5) 13(0.75,1.5) 14(0.25,1.5) 15(-0.25,1.5) 16(-0.75,1.5)
  rect 1.8x1.8 smd: 17(0,0)
QFN50P500X500X100-33N-S285
  rect 0.8x0.3 smd: 1(-2.5,1.75) 2(-2.5,1.25) 3(-2.5,0.75) 4(-2.5,0.25) 5(-2.5,-0.25) 6(-2.5,-0.75) 7(-2.5,-1.25) 8(-2.5,-1.75) 17(2.5,-1.75) 18(2.5,-1.25) 19(2.5,-0.75) 20(2.5,-0.25) 21(2.5,0.25) 22(2.5,0.75) 23(2.5,1.25) 24(2.5,1.75)
  rect 0.3x0.8 smd: 9(-1.75,-2.5) 10(-1.25,-2.5) 11(-0.75,-2.5) 12(-0.25,-2.5) 13(0.25,-2.5) 14(0.75,-2.5) 15(1.25,-2.5) 16(1.75,-2.5) 25(1.75,2.5) 26(1.25,2.5) 27(0.75,2.5) 28(0.25,2.5) 29(-0.25,2.5) 30(-0.75,2.5) 31(-1.25,2.5) 32(-1.75,2.5)
  rect 2.85x2.85 smd: 33(0,0)
QFN_64
  rect 0.61x0.279 smd: 1(-4.394,3.75) 2(-4.394,3.25) 3(-4.394,2.75) 4(-4.394,2.25) 5(-4.394,1.75) 6(-4.394,1.25) 7(-4.394,0.75) 8(-4.394,0.25) 9(-4.394,-0.25) 10(-4.394,-0.75) 11(-4.394,-1.25) 12(-4.394,-1.75) 13(-4.394,-2.25) 14(-4.394,-2.75) 15(-4.394,-3.25) 16(-4.394,-3.75) 33(4.394,-3.75) 34(4.394,-3.25) 35(4.394,-2.75) 36(4.394,-2.25) 37(4.394,-1.75) 38(4.394,-1.25) 39(4.394,-0.75) 40(4.394,-0.25) 41(4.394,0.25) 42(4.394,0.75) 43(4.394,1.25) 44(4.394,1.75) 45(4.394,2.25) 46(4.394,2.75) 47(4.394,3.25) 48(4.394,3.75)
  rect 0.279x0.61 smd: 17(-3.75,-4.394) 18(-3.25,-4.394) 19(-2.75,-4.394) 20(-2.25,-4.394) 21(-1.75,-4.394) 22(-1.25,-4.394) 23(-0.75,-4.394) 24(-0.25,-4.394) 25(0.25,-4.394) 26(0.75,-4.394) 27(1.25,-4.394) 28(1.75,-4.394) 29(2.25,-4.394) 30(2.75,-4.394) 31(3.25,-4.394) 32(3.75,-4.394) 49(3.75,4.394) 50(3.25,4.394) 51(2.75,4.394) 52(2.25,4.394) 53(1.75,4.394) 54(1.25,4.394) 55(0.75,4.394) 56(0.25,4.394) 57(-0.25,4.394) 58(-0.75,4.394) 59(-1.25,4.394) 60(-1.75,4.394) 61(-2.25,4.394) 62(-2.75,4.394) 63(-3.25,4.394) 64(-3.75,4.394)
  rect 4.4x4.4 smd: 65(0,0)
